# Altium PCB ProbeControl.PcbDoc (part 2 of 2)
Units mm, origin at the board's own origin, x right, y up, seen from the top; angles counter-clockwise.
Board outline 75 x 40.82 mm, 6 copper layers (L1, L2, L3, L4, L5, L6), stack 1.539 mm thick; 83 components, 74 nets, 352 pads, 245 vias.
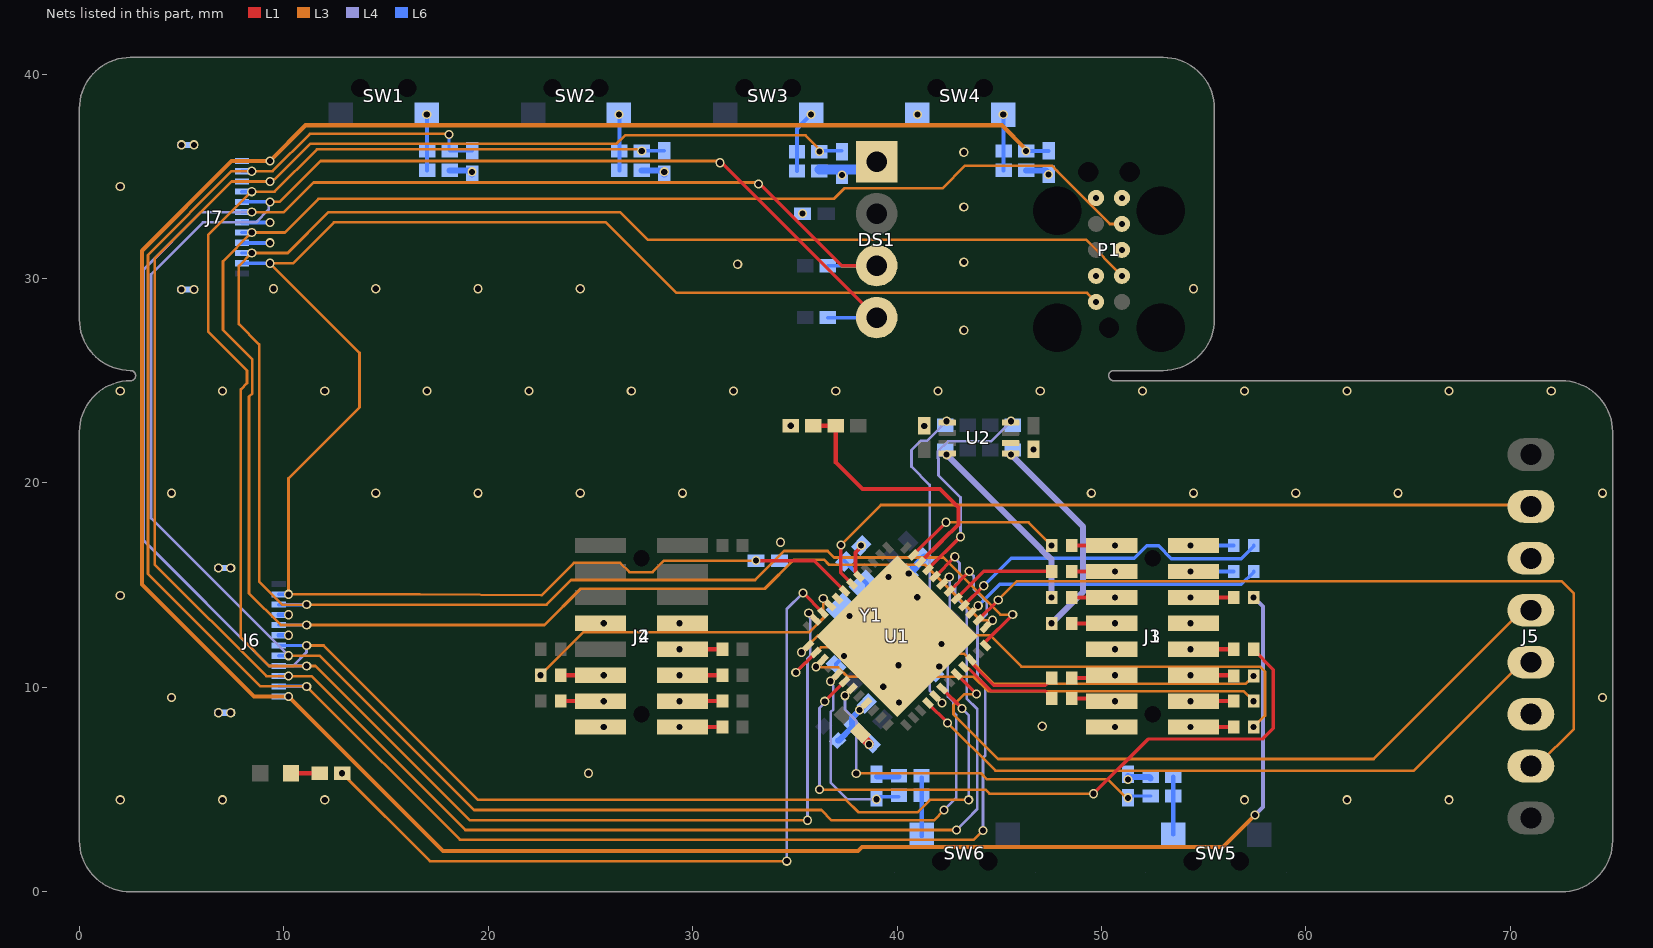
[diagram p6: the nets of this part, all layers, seen from the top]

## Via types
v1: diameter 0.45, hole 0.3, L1 to L6, tented both sides, 205 vias
v2: diameter 0.45, hole 0.3, L1 to L6, 40 vias

## Nets (pads, with @x,y where several pads share a name; then routed paths per layer and width w, separated by ;. In a path a pad name is that pad's centre, name@x,y a point inside that pad or via, vN(x,y) a via of type N, cw(c..) or ccw(c..) an arc to the next point about the centre after c; other vN are vias at no path point) (continued)
BTN.CAL: C12.2 J6.11 J7.2 R5.2 U1.42 | length 97.8
  L1 w0.165: U1.42@42.565,14.71 42.565,14.714 43.531,15.68 v1(43.531,15.682)
  L3 w0.131: v1(18.083,37.043) 18.049,37.077 11.277,37.077 9.449,35.249 v1(8.429,35.249) 7.449,35.249 3.354,31.154 3.354,15.546 8.852,10.048 v1(11.117,10.048) 18.611,2.555 43.755,2.555 v1(44.2,3)
  L4 w0.131: v1(43.531,15.682) 43.531,15.658 43.743,15.446 43.743,14.807 44.386,14.165 44.386,13.591 43.929,13.134 43.929,10.498 44.305,10.122 44.305,6.657 44.2,6.551 v1(44.2,3)
  L6 w0.165: J7.2@7.945,35.249 v1(8.429,35.249) ; J6.11@9.75,10.05 v1@11.116,10.05 ; v1(18.083,37.043) 18.083,36.268 R5.2@18.111,36.24 ; R5.2@18.108,36.243 C12.2@19.211,36.243
BTN.Enable: C15.2 J6.12 J7.1 L4.1 R11.2 | length 137.1
  L3 w0.2: v1@9.316,35.748 11.066,37.498 45.133,37.498 v1@46.311,36.32 ; v1(9.317,35.746) 7.446,35.746 3.058,31.358 3.058,15.042 8.548,9.552 v1(10.229,9.552) 17.78,2 38.088,2 38.288,2.2 55.945,2.2 v1(57.5,3.755)
  L4 w0.2: v1(57.44,14.405) 57.895,13.95 57.895,4.15 v1(57.5,3.755)
  L6 w0.2: J7.1@7.95,35.748 v1@9.316,35.748 ; J6.12@9.745,9.552 v1(10.229,9.552) ; R11.2@46.314,36.243 C15.2@47.411,36.243
  other v1: 46.311,36.24
BTN.Spare0: C16.2 R13.2 U1.19 | length 19.5
  L1 w0.165: v1(37.449,9.595) U1.19@37.79,9.937
  L3 w0.131: v1(37.999,5.787) 38.013,5.8 44.106,5.8 44.406,5.5 50.318,5.5 v1@51.3,4.518
  L4 w0.131: v1(37.449,9.595) 37.449,8.924 37.999,8.373 v1(37.999,5.787)
  L6 w0.165: v1(51.3,4.598) 51.389,4.687 R13.2@52.4,4.687
BTN.Spare1: C17.2 R15.2 U1.17 | length 9.1
  L1 w0.165: v1(36.742,10.302) U1.17@37.083,10.644
  L4 w0.131: v1(36.742,10.302) 36.742,10.216 36.88,10.077 36.88,8.919 36.747,8.785 36.747,5.357 37.578,4.526 v1(38.992,4.526)
  L6 w0.165: C17.2@39.116,4.65 R15.2@40.092,4.65
BTN.VScale.Down: C14.2 J6.10 J7.3 R9.2 U1.44 | length 113.8
  L1 w0.165: U1.44@41.858,15.417 41.858,15.421 42.824,16.387 v1(42.824,16.389)
  L3 w0.131: v1@36.353,36.17 35.518,37.005 26.697,37.005 26.287,36.595 11.295,36.595 9.549,34.849 9.506,34.849 9.404,34.746 v1(9.317,34.746) 7.446,34.746 3.685,30.985 3.685,16.015 9.148,10.552 v1(10.229,10.552) 11.348,10.552 18.88,3.02 v1(42.9,3.02)
  L4 w0.131: v1(42.824,16.389) 42.824,16.303 43.048,16.079 43.048,15.207 42.838,14.997 42.838,14.435 43.401,13.872 43.401,9.451 43.92,8.932 43.92,4.041 43.401,3.521 v1(42.9,3.02)
  L6 w0.165: J7.3@7.95,34.748 v1@9.316,34.748 ; J6.10@9.745,10.552 v1(10.229,10.552) ; R9.2@36.2,36.243 C14.2@37.3,36.243
  other v1: 36.203,36.211
BTN.VScale.Up: C13.2 J6.9 J7.4 R7.2 U1.11 | length 88.7
  L1 w0.165: v1(35.681,13.637) U1.11@36.023,13.295
  L3 w0.131: v1@27.511,36.32 11.62,36.32 9.549,34.249 v1(8.429,34.249) 6.3,32.121 6.3,27.4 8.2,25.5 8.2,24.882 7.9,24.582 7.9,12.434 9.286,11.048 v1(11.117,11.048) 11.552,11.048 19.1,3.5 v1(35.614,3.5) v1@35.7,3.5
  L4 w0.131: v1(35.614,3.5) 35.614,11.409 35.748,11.542 35.748,13.401 35.742,13.407 35.742,13.576 v1(35.681,13.637)
  L6 w0.165: J7.4@7.945,34.249 v1(8.429,34.249) ; J6.9@9.75,11.05 v1@11.116,11.05 ; R7.2@27.514,36.243 C13.2@28.611,36.243
  other v1: 27.511,36.24
CMN.ADC1_SPR: J2.14 J4.14 L17.2 | length 2.1
  L1 w0.2: L17.2@23.54,9.325 J2.14@25.5,9.325 v1(25.65,9.325)
CMN.AMP_EN: J1.5 J3.5 L4.2 | length 2.1
  L1 w0.2: v1(54.35,14.405) J1.5@54.5,14.405 L4.2@56.46,14.405
CMN.AN0: J2.9 J4.9 L13.2 | length 2.1
  L1 w0.2: v1(29.35,11.865) J2.9@29.5,11.865 L13.2@31.46,11.865
CMN.AN1: J2.11 J4.11 L14.2 | length 2.1
  L1 w0.2: v1(29.35,10.595) J2.11@29.5,10.595 L14.2@31.46,10.595
CMN.AN2: J2.13 J4.13 L15.2 | length 2.1
  L1 w0.2: v1(29.35,9.325) J2.13@29.5,9.325 L15.2@31.46,9.325
CMN.AN3: J2.15 J4.15 L16.2 | length 2.1
  L1 w0.2: v1(29.35,8.055) J2.15@29.5,8.055 L16.2@31.46,8.055
CMN.FIBER_RX: J1.1 J3.1 L21.2 | length 2.1
  L1 w0.2: v1(54.35,16.945) J1.1@54.5,16.945
  L6 w0.2: J3.1@54.5,16.945 L21.2@56.46,16.945
CMN.FIBER_TX: J1.3 J3.3 L20.2 | length 2.1
  L1 w0.2: v1(54.35,15.675) J1.3@54.5,15.675
  L6 w0.2: J3.3@54.5,15.675 L20.2@56.46,15.675
CMN.GPIO0: J1.2 J3.2 L11.2 | length 2.1
  L1 w0.2: L11.2@48.54,16.945 J1.2@50.5,16.945 v1(50.65,16.945)
CMN.GPIO1: J1.4 J3.4 L12.2 | length 2.1
  L1 w0.2: L12.2@48.54,15.675 J1.4@50.5,15.675 v1(50.65,15.675)
CMN.I2C4_SCL: J1.6 J3.6 L5.2 | length 2.1
  L1 w0.2: L5.2@48.54,14.405 J1.6@50.5,14.405 v1(50.65,14.405)
CMN.I2C4_SDA: J1.8 J3.8 L6.2 | length 2.1
  L1 w0.2: L6.2@48.54,13.135 J1.8@50.5,13.135 v1(50.65,13.135)
CMN.SPI1_CS1: J1.9 J3.9 L10.2 | length 2.1
  L1 w0.2: v1(54.35,11.865) J1.9@54.5,11.865 L10.2@56.46,11.865
CMN.SPI1_MISO: J1.11 J3.11 L8.2 | length 2.1
  L1 w0.2: v1(54.35,10.595) J1.11@54.5,10.595 L8.2@56.46,10.595
CMN.SPI1_MOSI: J1.13 J3.13 L9.2 | length 2.1
  L1 w0.2: v1(54.35,9.325) J1.13@54.5,9.325 L9.2@56.46,9.325
CMN.SPI1_SCK: J1.15 J3.15 L7.2 | length 2.1
  L1 w0.2: v1(54.35,8.055) J1.15@54.5,8.055 L7.2@56.46,8.055
CMN.USB_DM: J1.14 J3.14 L18.2 | length 2
  L1 w0.2: L18.2@48.54,9.454 50.359,9.454 J1.14@50.5,9.312
  other v1: 50.65,9.325
CMN.USB_DP: J1.12 J3.12 L19.2 | length 2
  L1 w0.2: L19.2@48.54,10.454 50.359,10.454 J1.12@50.5,10.595
  other v1: 50.65,10.595
CMN.VBAT1: J2.12 J4.12 L23.2 | length 2.1
  L1 w0.2: L23.2@23.54,10.595 J2.12@25.5,10.595 v1(25.65,10.595)
COM: C1.2 C2.1 C3.2 C4.2 C5.1 C6.1 C7.2 C8.1 C9.2 C10.2 C11.2 C12.1 C13.1 C14.1 C15.1 C16.1 C17.1 C18.1 C19.1 C20.1 DS1.1 J1.7 J1.10 J1.16 J2.7 J2.8 J2.16 J3.7 J3.10 J3.16 J4.7 J4.8 J4.16 J5.3 J5.6 J6.4 J6.6 J6.13 J7.7 J7.9 J7.13 P1.3 P1.5 P1.9 R4.1 R6.1 R8.1 R10.1 R12.1 R14.1 R16.1 SW4.1 U1.49 U2.2 Y1.2 | length 17.7
  L1 w0.45: C6.1@38.214,7.771 38.214,7.665 38.618,7.26 v1(38.618,7.222)
  L6 w0.2: J7.9@7.95,31.748 v1@9.316,31.748 ; J7.7@7.95,32.748 v1@9.316,32.748 ; J6.6@9.745,12.552 v1(10.229,12.552) ; J6.4@9.745,13.552 v1(10.229,13.552) ; C7.2@37.005,11.077 37.005,11.147 v1(37.397,11.538)
  L6 w0.3: R6.1@18.111,35.29 19.061,35.29 19.211,35.14 C12.1@19.211,35.093 v1(19.211,35.22) ; R8.1@27.511,35.29 28.461,35.29 28.611,35.14 C13.1@28.611,35.093 v1(28.611,35.22) ; C17.1@39.03,5.638 R16.1@40.054,5.638 ; R12.1@46.311,35.29 47.261,35.29 47.411,35.14 v1(47.411,35.093) ; C16.1@51.3,5.668 51.355,5.612 52.345,5.612 R14.1@52.4,5.557
  L6 w0.4: v1(40.101,9.252) C9.2@40.243,9.252 ; v1(40.57,15.573) 40.572,15.573 41.348,16.35 C11.2@41.35,16.35
  L6 w0.5: R10.1@36.2,35.338 38.628,35.338 DS1.1@39,35.71 ; C10.2@41.776,12.52 v1(42.165,12.131) C8.1@42.554,11.742 42.554,11.671 42.466,11.583 42.466,11.406 v1@42.069,11.01 ; C1.2@41.802,10.742 41.802,10.752 v1(42.064,11.015)
  other v1: 51.3,5.5 24.9,5.8 25.65,8.055 50.65,8.055 47.1,8.1 6.8,8.762 7.4,8.762 39.324,10.03 40.066,11.086 50.65,11.865 25.65,13.135 29.35,13.135 54.35,13.135 37.662,13.49 40.986,14.409 39.571,15.399 6.8,15.842 7.4,15.842 34.3,17.1 46.675,21.642 34.8,22.8 41.325,22.792 43.263,27.473 5,29.46 5.6,29.46 49.73,30.13 32.2,30.7 43.263,30.8 51,31.4 9.317,31.746 9.317,32.746 35.375,33.175 43.263,33.5 51,33.94 37.3,35.061 43.263,36.174 5,36.54 5.6,36.54 40.991,38.018
  other v2: 2,4.5 7,4.5 12,4.5 57,4.5 62,4.5 67,4.5 4.5,9.5 74.5,9.5 2,14.5 4.5,19.5 14.5,19.5 19.5,19.5 24.5,19.5 29.5,19.5 49.5,19.5 54.5,19.5 59.5,19.5 64.5,19.5 74.5,19.5 2,24.5 7,24.5 12,24.5 17,24.5 22,24.5 27,24.5 32,24.5 37,24.5 42,24.5 47,24.5 52,24.5 57,24.5 62,24.5 67,24.5 72,24.5 9.5,29.5 14.5,29.5 19.5,29.5 24.5,29.5 54.5,29.5 2,34.5
DISP.SCL: DS1.3 J6.7 J7.6 R18.1 U1.30 | length 109.9
  L1 w0.165: v1@33.215,34.7 37.285,30.63 DS1.3@39,30.63 ; U1.30@42.21,9.935 43.178,8.967 v1(43.178,8.964)
  L3 w0.131: v1(8.429,33.249) 10,33.249 11.451,34.7 v1@33.215,34.7 ; v1(11.117,12.048) 11.952,12.048 19.5,4.5 37.5,4.5 38.1,3.9 41.012,3.9 41.612,4.5 v1(43.5,4.5)
  L4 w0.131: v1(8.429,33.249) 5.949,33.249 3.148,30.448 3.148,17.186 9.286,11.048 10.442,11.048 11.113,11.719 11.113,12.044 v1(11.117,12.048) ; v1(43.178,8.964) 43.5,8.642 v1(43.5,4.5)
  L6 w0.165: J7.6@7.945,33.249 v1(8.429,33.249) ; J6.7@9.75,12.05 v1@11.116,12.05 ; R18.1@36.6,30.63 DS1.3@39,30.63
  other v1: 33.215,34.62
DISP.SDA: DS1.4 J6.8 J7.5 R17.1 U1.43 | length 114.9
  L1 w0.165: v1@31.344,35.746 DS1.4@39,28.09 ; U1.43@42.21,15.063 v1(42.551,15.405)
  L3 w0.131: v1(9.317,33.748) 9.793,33.748 11.791,35.746 v1@31.344,35.746 ; v1(10.229,11.552) 11.748,11.552 19.3,4 36.3,4 36.8,3.5 41.8,3.5 v1(42.3,4)
  L4 w0.131: v1(9.317,33.748) 9.256,33.687 9.256,33.376 8.628,32.748 6.046,32.748 3.5,30.202 3.5,18.28 v1(10.229,11.552) ; v1@9.419,33.702 v1@9.465,33.748 ; v1(42.3,4) 42.891,4.591 42.891,8.657 42.757,8.79 42.757,9.276 42.485,9.549 42.485,11.205 42.585,11.306 42.585,12.737 42.578,12.744 42.578,15.379 v1(42.551,15.405)
  L6 w0.165: J7.5@7.95,33.748 v1(9.317,33.748) ; J6.8@9.745,11.552 v1(10.229,11.552) ; R17.1@36.6,28.09 DS1.4@39,28.09
  other v1: 31.344,35.666
FIBER.Rx: L21.1 U1.40 | length 15.9
  L1 w0.165: U1.40@43.273,14.003 43.273,14.007 44.238,14.973 v1(44.238,14.975)
  L6 w0.165: v1(44.238,14.975) 45.573,16.309 51.595,16.309 52.208,16.923 52.792,16.923 53.414,16.3 56.83,16.3 57.44,16.91 L21.1@57.44,16.945
FIBER.Tx: L20.1 U1.39 | length 14.7
  L1 w0.165: U1.39@43.624,13.649 v1(43.966,13.991)
  L6 w0.165: v1(43.966,13.991) 45.015,15.04 56.84,15.04 57.44,15.64 L20.1@57.44,15.675
GPIO1: L12.1 U1.41 | length 5.2
  L1 w0.165: U1.41@42.917,14.356 44.236,15.675 L12.1@47.56,15.675
I2C4_SCL: R19.1 U1.29 U2.5 | length 15.8
  L1 w0.165: U1.29@41.856,9.583 v1(42.198,9.242)
  L4 w0.131: v1(42.198,9.242) 41.59,9.85 41.59,19.91 40.7,20.8 40.7,21.611 41.151,22.062 41.47,22.062 v1(42.424,23.016)
I2C4_SDA: R20.1 U1.45 U2.4 | length 11.1
  L1 w0.165: U1.45@41.503,15.77 v1(43.101,17.369)
  L4 w0.131: v1(43.101,17.369) 43.101,19.299 42.025,20.375 42.025,21.188 42.004,21.21 42.004,21.558 42.479,22.033 44.593,22.033 v1(45.576,23.016)
I2C.SCL.5V: L5.1 R21.1 U2.8 | length 9.1
  L4 w0.3: v1(42.424,21.384) 47.055,16.753 47.055,16.736 47.351,16.44 47.368,16.44 47.56,16.248 v1(47.56,14.405)
I2C.SDA.5V: L6.1 R22.1 U2.1 | length 10.3
  L4 w0.3: v1(45.576,21.384) 49.1,17.86 49.1,14.686 ; v1(47.56,13.135) 49.1,14.675
LED.GREEN: R3.1 U1.10 | length 38.4
  L1 w0.165: v1(35.4,14.621) 35.402,14.621 36.372,13.651 U1.10@36.376,13.649
  L3 w0.131: v1(12.85,5.8) 17.15,1.5 v1(34.6,1.5)
  L4 w0.131: v1(34.6,1.5) 34.6,13.822 v1(35.4,14.621)
NetC3_1: C3.1 C5.2 L1.1 U1.21 | length 4.6
  L1 w0.2: v1(38.156,8.888) U1.21@38.497,9.23
  L6 w0.2: L1.1@37.1,7.4 37.79,8.09 37.842,8.09 C5.2@37.895,8.09 C5.2@37.807,8.178 ; C5.2@37.807,8.461 37.895,8.549 37.895,8.56 38.156,8.82 38.156,8.862 v1(38.156,8.888)
  L6 w0.3: L1.1@37.1,7.4 37.153,7.4 C5.2@37.842,8.09 ; C5.2@37.807,8.178 37.807,8.461 37.807,8.513 38.156,8.862 C3.1@38.51,9.217
NetD1_C: D1.C R3.2 | length 1.4
  L1 w0.2: D1.C@10.35,5.8 R3.2@11.75,5.8
NetR1_1: R1.1 R4.2 U1.46 | length 13.4
  L1 w0.2: R4.2@35.9,22.8 R1.1@37,22.8 37,21 38.3,19.7 42.1,19.7 43,18.8 43,17.977 42.222,17.199 ; U1.46@41.149,16.124 42.222,17.197 42.222,17.199 ; 42.117,17.096 42.118,17.095 42.222,17.199
NetR2_1: R2.1 Y1.3 | length 1.8
  L6 w0.2: R2.1@37.4,16.204 38.534,15.07 Y1.3@38.534,14.864
NetR2_2: R2.2 U1.5 | length 1.7
  L1 w0.2: U1.5@38.144,15.417 38.055,15.505 38.055,15.576 37.967,15.665 37.967,16.598 38.242,16.873 v1(38.242,16.941)
NetR5_1: R5.1 R6.2 SW1.2 | length 2.7
  L6 w0.2: v1(16.991,38.018) 17.011,37.997 R5.1@17.011,36.24 R6.2@17.011,35.29
NetR7_1: R7.1 R8.2 SW2.2 | length 2.7
  L6 w0.2: v1(26.391,38.018) 26.411,37.997 R7.1@26.411,36.24 R8.2@26.411,35.29
NetR9_1: R9.1 R10.2 SW3.2 | length 3
  L6 w0.2: R10.2@35.1,35.258 R9.1@35.1,36.208 35.1,37.327 v1(35.791,38.018)
NetR11_1: R11.1 R12.2 SW4.2 | length 2.7
  L6 w0.2: v1(45.191,38.018) SW4.2@45.211,37.997 ; R12.2@45.211,35.29 R11.1@45.211,36.24 ; R11.1@45.211,36.32 SW4.2@45.211,38.077
NetR13_1: R13.1 R14.2 SW5.2 | length 2.8
  L6 w0.2: R14.2@53.5,5.557 R14.2@53.507,5.55 ; SW5.2@53.507,2.8 R14.2@53.507,5.63
NetR15_1: R15.1 R16.2 SW6.2 | length 2.9
  L6 w0.2: R16.2@41.192,5.6 41.207,5.585 SW6.2@41.207,2.72
SPI1.MISO: L8.1 U1.14 | length 25.2
  L1 w0.165: v1(35.046,10.732) 35.048,10.732 36.02,11.705 U1.14@36.023,11.705
  L3 w0.131: v1(35.046,10.732) 36.272,11.958 37.571,11.958 37.878,11.651 43.264,11.651 44.74,10.175 57.049,10.175 v1(57.44,10.566)
SPI1.MOSI: L9.1 U1.15 | length 22.6
  L1 w0.165: v1(36.034,11.009) U1.15@36.376,11.351
  L3 w0.131: v1(36.034,11.009) 36.061,10.983 37.112,10.983 37.576,10.52 43.743,10.52 44.45,9.813 56.952,9.813 v1(57.44,9.325)
SPI1.SCK: L7.1 U1.13 | length 27.2
  L1 w0.165: v1(35.327,11.716) U1.13@35.669,12.058
  L3 w0.131: v1(35.327,11.716) 36.162,12.551 44.541,12.551 46.077,11.015 57.752,11.015 58,10.767 58,8.615 v1(57.44,8.055)
SPI1_CS1: L10.1 U1.18 | length 33.7
  L1 w0.165: v1(36.46,9.318) 36.462,9.318 U1.18@37.435,10.29 ; v1(49.6,4.8) 52.272,7.472 57.872,7.472 58.4,8 58.4,10.87 57.44,11.83 L10.1@57.44,11.865
  L3 w0.131: v1(36.2,5) 44.313,5 44.513,4.8 v1(49.6,4.8)
  L4 w0.131: v1(36.2,5) 36.2,8.982 36.46,9.242 v1(36.46,9.318)
SPI1_CS2: L11.1 U1.47 | length 7.9
  L1 w0.165: U1.47@40.795,16.477 v1(42.394,18.076)
  L3 w0.131: v1(42.394,18.076) 46.429,18.076 v1(47.56,16.945)
SPI2.MISO: J5.4 U1.32 | length 35.4
  L1 w0.165: U1.32@42.917,10.644 v1(43.885,9.672) v1(43.885,9.672)
  L3 w0.131: v1(43.885,9.672) 43.29,9.672 42.757,9.139 42.757,8.678 44.935,6.5 63.31,6.5 70.65,13.84 J5.4@71,13.84
SPI2.MOSI: J5.5 U1.28 | length 33.1
  L1 w0.165: U1.28@41.503,9.227 42.471,8.26 v1(42.471,8.257)
  L3 w0.131: v1(42.471,8.257) 44.803,5.925 65.275,5.925 70.65,11.3 J5.5@71,11.3
SPI2.SCK: J5.2 U1.6 | length 36.7
  L1 w0.165: v1(37.252,16.97) 37.252,15.602 U1.6@37.79,15.063
  L3 w0.131: v1(37.252,16.97) 39.202,18.92 J5.2@71,18.92
SPI2_CS: J5.7 U1.38 | length 39.6
  L1 w0.165: U1.38@43.977,13.295 43.98,13.3 44.945,14.266 v1(44.945,14.268)
  L3 w0.131: v1(44.945,14.268) 45.875,15.198 72.502,15.198 73.1,14.6 73.1,7.97 71.35,6.22 J5.7@71,6.22
SW.CLK: J6.5 J7.8 P1.4 U1.37 | length 105.9
  L1 w0.165: U1.37@44.331,12.942 v1(44.673,13.284)
  L3 w0.131: v1(44.673,13.284) 44.078,13.284 41.363,15.999 36.667,15.999 36.418,16.248 34.948,16.248 33.525,14.825 24.525,14.825 22.748,13.048 v1(11.117,13.048) 9.852,13.048 8.3,14.601 8.3,24.225 8.461,24.386 8.461,26.039 7.021,27.479 7.021,30.842 v1(8.429,32.249) 10.049,32.249 11.7,33.9 36.9,33.9 37.415,34.415 42.215,34.415 43.318,35.518 47.581,35.518 47.832,35.267 47.832,35.254 49.31,33.776 49.31,33.766 50.406,32.67 v1(51,32.67)
  L6 w0.165: J7.8@7.945,32.249 v1(8.429,32.249) ; J6.5@9.75,13.05 v1@11.116,13.05
SW.DIO: J6.3 J7.10 P1.2 U1.36 | length 105.1
  L1 w0.165: U1.36@44.331,12.058 44.289,12.099 44.289,12.195 v1@45.653,13.559
  L3 w0.131: v1(45.653,13.561) 45.058,13.561 42.264,16.355 36.919,16.355 36.602,16.672 34.472,16.672 33.055,15.255 24.055,15.255 22.848,14.048 v1(11.117,14.048) 9.916,14.048 8.793,15.171 8.793,26.772 7.8,27.766 7.8,30.621 v1(8.429,31.249) 10.193,31.249 12.193,33.249 26.451,33.249 27.8,31.9 49.23,31.9 v1(51,30.13)
  L6 w0.165: J7.10@7.945,31.249 v1(8.429,31.249) ; J6.3@9.75,14.05 v1@11.116,14.05
SW.nRST: C2.2 J6.2 J7.11 P1.10 U1.7 | length 93.1
  L1 w0.165: v1(33.1,16.2) 35.946,16.2 U1.7@37.437,14.71
  L3 w0.131: v1(33.1,16.2) 28.595,16.2 28.032,15.637 26.903,15.637 26.444,16.095 24.196,16.095 22.6,14.5 16.652,14.552 v1(10.229,14.552) 10.229,20.229 13.7,23.7 13.7,26.364 v1(9.317,30.746) 10.446,30.746 12.446,32.746 25.754,32.746 29.2,29.3 38.497,29.3 38.498,29.301 39.502,29.301 39.503,29.3 49.29,29.3 v1(49.73,28.86)
  L6 w0.165: J7.11@7.95,30.748 v1@9.316,30.748 ; J6.2@9.745,14.552 v1(10.229,14.552)
SW.O: P1.6
  other v1: 49.73,33.94
USB.D_N: L18.1 U1.33 | length 5
  L1 w0.148: U1.33@43.27,10.997 43.359,10.909 43.518,10.909 44.611,9.816 47.262,9.816 47.349,9.729 47.349,9.665 L18.1@47.56,9.454
USB.D_P: L19.1 U1.34 | length 4.7
  L1 w0.148: U1.34@43.624,11.351 43.712,11.263 43.712,11.104 44.725,10.091 47.262,10.091 47.349,10.178 47.349,10.243 L19.1@47.56,10.454
VBat0: U1.8 | length 0
VBat1: L23.1 U1.9 | length 16.4
  L1 w0.165: v1(36.388,14.344) U1.9@36.73,14.003
  L3 w0.131: v1(22.56,10.595) 24.665,12.7 35.707,12.7 36.388,13.381 v1(36.388,14.344)
pads on no net: J3. J4. P1. P1.7 P1.8 SW1.0 SW2.0 SW3.0 SW4.0 SW5.0 SW6.0 U1.2 U1.3 U1.4 U1.12 U1.22 U1.24
copper on no net:
  other v1: 11,39.52 18.782,39.52 20.4,39.52 28.182,39.52 29.8,39.52 37.582,39.52 39.2,39.52 46.982,39.52 11.7,40.22 18.082,40.22 21.1,40.22 27.482,40.22 30.5,40.22 36.882,40.22 39.9,40.22 46.282,40.22

## Polygon pours and split planes (outlines as drawn)
COM on L5 "COM_L05_P000" (solid, remove dead copper, pour order 0): 0,2.5 ccw(c2.5,2.5) 2.5,0 72.5,0 ccw(c72.5,2.5) 75,2.5 75,22.5 ccw(c72.5,22.5) 72.5,25 53.018,25 cw(c53.018,25.25) 53.018,25.5 ccw(c53.018,28) 55.518,28 55.518,38.318 ccw(c53.018,38.318) 53.018,40.818 2.5,40.818 ccw(c2.5,38.318) 0,38.318 0,28 ccw(c2.5,28) 2.5,25.5 cw(c2.5,25.25) 2.5,25 ccw(c2.5,22.5) 0,22.5
COM on L2 "COM_L02_P001" (solid, remove dead copper, pour order 1): 0,2.5 ccw(c2.5,2.5) 2.5,0 72.5,0 ccw(c72.5,2.5) 75,2.5 75,22.5 ccw(c72.5,22.5) 72.5,25 53.018,25 cw(c53.018,25.25) 53.018,25.5 ccw(c53.018,28) 55.518,28 55.518,38.318 ccw(c53.018,38.318) 53.018,40.818 2.5,40.818 ccw(c2.5,38.318) 0,38.318 0,28 ccw(c2.5,28) 2.5,25.5 cw(c2.5,25.25) 2.5,25 ccw(c2.5,22.5) 0,22.5
COM on L3 "COM_L03_P004" (solid, remove dead copper, pour order 4): 0,2.5 ccw(c2.5,2.5) 2.5,0 72.5,0 ccw(c72.5,2.5) 75,2.5 75,22.5 ccw(c72.5,22.5) 72.5,25 53.018,25 50.599,25 cw(c50.599,25.25) 50.599,25.5 53.018,25.5 ccw(c53.018,28) 55.518,28 55.518,38.318 ccw(c53.018,38.318) 53.018,40.818 2.5,40.818 ccw(c2.5,38.318) 0,38.318 0,28 ccw(c2.5,28) 2.5,25.5 cw(c2.5,25.25) 2.5,25 ccw(c2.5,22.5) 0,22.5
COM on L6 "COM_L06_P005" (solid, remove dead copper, pour order 5): 0,2.5 ccw(c2.5,2.5) 2.5,0 72.5,0 ccw(c72.5,2.5) 75,2.5 75,22.5 ccw(c72.5,22.5) 72.5,25 53.018,25 50.599,25 cw(c50.599,25.25) 50.599,25.5 53.018,25.5 ccw(c53.018,28) 55.518,28 55.518,38.318 ccw(c53.018,38.318) 53.018,40.818 2.5,40.818 ccw(c2.5,38.318) 0,38.318 0,28 ccw(c2.5,28) 2.5,25.5 cw(c2.5,25.25) 2.5,25 ccw(c2.5,22.5) 0,22.5
COM on L1 "COM_L01_P006" (solid, remove dead copper, pour order 6): 0,2.5 ccw(c2.5,2.5) 2.5,0 72.5,0 ccw(c72.5,2.5) 75,2.5 75,22.5 ccw(c72.5,22.5) 72.5,25 53.018,25 50.599,25 cw(c50.599,25.25) 50.599,25.5 53.018,25.5 ccw(c53.018,28) 55.518,28 55.518,38.318 ccw(c53.018,38.318) 53.018,40.818 2.5,40.818 ccw(c2.5,38.318) 0,38.318 0,28 ccw(c2.5,28) 2.5,25.5 cw(c2.5,25.25) 2.5,25 ccw(c2.5,22.5) 0,22.5
COM on L4 "COM_L04_P003" (solid, remove dead copper, pour order 3): 0,2.5 ccw(c2.5,2.5) 2.5,0 72.5,0 ccw(c72.5,2.5) 75,2.5 75,22.5 ccw(c72.5,22.5) 72.5,25 53.018,25 50.599,25 cw(c50.599,25.25) 50.599,25.5 53.018,25.5 ccw(c53.018,28) 55.518,28 55.518,38.318 ccw(c53.018,38.318) 53.018,40.818 2.5,40.818 ccw(c2.5,38.318) 0,38.318 0,28 ccw(c2.5,28) 2.5,25.5 cw(c2.5,25.25) 2.5,25 ccw(c2.5,22.5) 0,22.5

## Other copper
L6:
  region: 17.591,39.818 18.391,39.818 18.391,39.118 19.091,39.118 19.091,40.618 17.591,40.618
  region: 12.191,39.818 11.391,39.818 11.391,39.118 10.691,39.118 10.691,40.618 12.191,40.618
  region: 26.991,39.818 27.791,39.818 27.791,39.118 28.491,39.118 28.491,40.618 26.991,40.618
  region: 21.591,39.818 20.791,39.818 20.791,39.118 20.091,39.118 20.091,40.618 21.591,40.618
  region: 36.391,39.818 37.191,39.818 37.191,39.118 37.891,39.118 37.891,40.618 36.391,40.618
  region: 30.991,39.818 30.191,39.818 30.191,39.118 29.491,39.118 29.491,40.618 30.991,40.618
  region: 45.791,39.818 46.591,39.818 46.591,39.118 47.291,39.118 47.291,40.618 45.791,40.618
  region: 40.391,39.818 39.591,39.818 39.591,39.118 38.891,39.118 38.891,40.618 40.391,40.618
  region: 58.307,1 59.107,1 59.107,1.7 59.807,1.7 59.807,0.2 58.307,0.2
  region: 52.907,1 52.107,1 52.107,1.7 51.407,1.7 51.407,0.2 52.907,0.2
  region: 46.007,1 46.807,1 46.807,1.7 47.507,1.7 47.507,0.2 46.007,0.2
  region: 40.607,1 39.807,1 39.807,1.7 39.107,1.7 39.107,0.2 40.607,0.2

## Silkscreen, mask and mechanical layers (free items; w line width, h text height)
Top Overlay:
  text "CAL" at 8.948,38.454 h1.52
  text "ENABLE" at 45.456,38.454 h1.52
  text "GAIN+" at 16.993,38.054 h1.52
  text "GAIN-" at 27.193,38.054 h1.52
  text "Optically Isolated" at 2.979,21.773 h4.5
  text "Control" at 15.669,18.425 h4.5
  text "Nov 2026" at 18.311,2.1 h1
  text "Rev. A" at 20.629,0.6 h1
Mechanical 1:
  lines w0.01: 72.5,25 cw(c72.5,22.5) 75,22.5 75,2.5 cw(c72.5,2.5) 72.5,0 2.5,0 cw(c2.5,2.5) 0,2.5 0,22.5 cw(c2.5,22.5) 2.5,25 ccw(c2.5,25.25) 2.5,25.5 cw(c2.5,28) 0,28 0,38.318 cw(c2.5,38.318) 2.5,40.818 53.018,40.818 cw(c53.018,38.318) 55.518,38.318 55.518,28 cw(c53.018,28) 53.018,25.5 50.599,25.5 ccw(c50.599,25.25) 50.599,25 53.018,25 72.5,25 ; 72.5,25 72.5,25
  lines w0.05: 4.2,25 cw(c4.2,25.25) 4.2,25.5 7.65,25.5 cw(c7.65,25.25) 7.65,25 4.2,25 ; 9.35,25 cw(c9.35,25.25) 9.35,25.5 12.8,25.5 cw(c12.8,25.25) 12.8,25 9.35,25 ; 14.5,25 cw(c14.5,25.25) 14.5,25.5 17.95,25.5 cw(c17.95,25.25) 17.95,25 14.5,25 ; 19.65,25 cw(c19.65,25.25) 19.65,25.5 23.1,25.5 cw(c23.1,25.25) 23.1,25 19.65,25 ; 24.8,25 cw(c24.8,25.25) 24.8,25.5 28.25,25.5 cw(c28.25,25.25) 28.25,25 24.8,25 ; 29.95,25 cw(c29.95,25.25) 29.95,25.5 33.4,25.5 cw(c33.4,25.25) 33.4,25 29.95,25 ; 35.149,25 cw(c35.149,25.25) 35.149,25.5 38.599,25.5 cw(c38.599,25.25) 38.599,25 35.149,25 ; 40.299,25 cw(c40.299,25.25) 40.299,25.5 43.749,25.5 cw(c43.749,25.25) 43.749,25 40.299,25 ; 45.449,25 cw(c45.449,25.25) 45.449,25.5 48.899,25.5 cw(c48.899,25.25) 48.899,25 45.449,25
KEEPOUT_TOP:
  circle w0.1: c4.5,30.5 r1.65
  circle w0.1: c65.5,30.5 r1.65
  circle w0.1: c4.5,4.5 r1.65
  circle w0.1: c65.5,4.5 r1.65
  lines w0.1: 0,4.5 ccw(c4.5,4.5) 4.5,0 65.5,0 ccw(c65.5,4.5) 70,4.5 70,13.5 69,13.5 69,11.486 cw(c67,11.486) 67.111,9.489 ccw(c67.5,2.5) 61.137,5.417 cw(c56.591,7.5) 56.591,2.5 14.5,2.5 cw(c14.5,7.5) 9.5,7.5 9.5,13 0,13 0,4.5 ; 0,22 0,30.5 cw(c4.5,30.5) 4.5,35 65.5,35 cw(c65.5,30.5) 70,30.5 70,21.5 69,21.5 69,23.514 ccw(c67,23.514) 67.111,25.511 cw(c67.5,32.5) 61.137,29.583 ccw(c56.591,27.5) 56.591,32.5 14.5,32.5 ccw(c14.5,27.5) 9.5,27.5 9.5,22 0,22
KEEPOUT_BOTTOM:
  circle w0.1: c65.5,30.5 r1.65
  circle w0.1: c4.5,30.5 r1.65
  circle w0.1: c65.5,4.5 r1.65
  circle w0.1: c4.5,4.5 r1.65
  lines w0.1: 0,4.5 ccw(c4.5,4.5) 4.5,0 65.5,0 ccw(c65.5,4.5) 70,4.5 70,11.5 69,11.5 69,11.486 cw(c67,11.486) 67.111,9.489 ccw(c67.5,2.5) 61.137,5.417 cw(c56.591,7.5) 56.591,2.5 14.5,2.5 cw(c14.5,7.5) 9.5,7.5 9.5,13 0,13 0,4.5 ; 0,22 9.5,22 9.5,27.5 cw(c14.5,27.5) 14.5,32.5 56.591,32.5 cw(c56.591,27.5) 61.137,29.583 ccw(c67.5,32.5) 67.111,25.511 cw(c67,23.514) 69,23.514 69,23.5 70,23.5 70,30.5 ccw(c65.5,30.5) 65.5,35 4.5,35 ccw(c4.5,30.5) 0,30.5 0,22
Fab Notes:
  lines w0.1: 0,40.5 52,40.5 ; 16,37.5 16,43.5 ; 27,37.5 27,43.5 ; 41,37.5 41,43.5 ; 0,37.5 0,43.5 52,43.5 52,37.5 0,37.5 ; 0,49.5 16,49.5 16,52.5 0,52.5 0,49.5
  text "Stackup" at 1.25,53.75 h1.5
  text "JLC04161H-7628" at 1.2,50.3 h1
  text "Impedance" at 1.25,44.75 h1.5
  text "Signal Layer" at 17,41.5 h1
  text "Reference Layer" at 28,41.5 h1
  text "Trace Width" at 42,41.5 h1
  text "Impedance Type" at 1.2,41.3 h1
  text "50 Ohm Microstrip" at 1,38.5 h1
  text "0.3493" at 42,38.5 h1
  text "L1" at 17.2,38.3 h1
  text "L2" at 28.2,38.3 h1
OL2:
  lines w0.01: 0,13 0,22 9.595,22 9.595,13 0,13
  lines w0.02: 55.5,24.925 56.75,24.925 56.75,29.075 55.5,29.075 55.5,24.925
  lines w0.04: 58.25,25.45 59.35,25.45 59.35,26.05 58.25,26.05 58.25,25.45
  lines w0.05: 12.45,23.225 12.45,21.105 12.605,20.95 12.605,19.5 13.205,19.5 13.205,20.95 13.3,21.045 13.3,23.225 12.45,23.225 ; 12.45,23.225 12.45,23.225 ; 11.3,20.985 11.3,25.55 12.15,25.55 12.15,21.165 11.935,20.95 11.935,19.5 11.335,19.5 11.335,20.95 11.3,20.985 ; 58.85,20.975 58.85,22.025 61.15,22.025 61.15,20.975 58.85,20.975 ; 64.28,14.895 66.18,14.895 66.18,20.105 64.28,20.105 64.28,14.895
  lines w0.1: 0,4.5 ccw(c4.5,4.5) 4.5,0 48,0 ccw(c48,1) 49,1 49,6.8 cw(c50,6.8) 50,7.8 56,7.8 cw(c56,6.8) 57,6.8 57,1 ccw(c58,1) 58,0 65.5,0 ccw(c65.5,4.5) 70,4.5 70,30.5 ccw(c65.5,30.5) 65.5,35 4.5,35 ccw(c4.5,30.5) 0,30.5 0,4.5
OL3:
  drawing of 162 lines, arcs and shapes, not listed

## Text inside footprints (layer, text, board x,y; h text height)
SW1: Bottom Courtyard "Button Tip" at 13.177,41.301 h0.5 r180; Bottom Courtyard "Bump" at 13.989,40.521 h0.5 r180
SW2: Bottom Courtyard "Button Tip" at 22.577,41.301 h0.5 r180; Bottom Courtyard "Bump" at 23.389,40.521 h0.5 r180
SW3: Bottom Courtyard "Button Tip" at 31.977,41.301 h0.5 r180; Bottom Courtyard "Bump" at 32.789,40.521 h0.5 r180
SW4: Bottom Courtyard "Button Tip" at 41.377,41.301 h0.5 r180; Bottom Courtyard "Bump" at 42.189,40.521 h0.5 r180
SW5: Bottom Courtyard "Bump" at 56.51,0.297 h0.5; Bottom Courtyard "Button Tip" at 57.321,-0.483 h0.5
SW6: Bottom Courtyard "Bump" at 44.21,0.297 h0.5; Bottom Courtyard "Button Tip" at 45.021,-0.483 h0.5